# Altium PCB Main-Board-V1.0.0.PcbDoc (part 3 of 3)
Units mil, origin at the board's own origin, x right, y up, seen from the top; angles counter-clockwise.
Board outline 3599.72 x 1771.65 mil, 4 copper layers (Top Layer, Layer 1, Layer 2, Bottom Layer), stack 62.449 mil thick; 106 components, 61 nets, 344 pads, 252 vias.
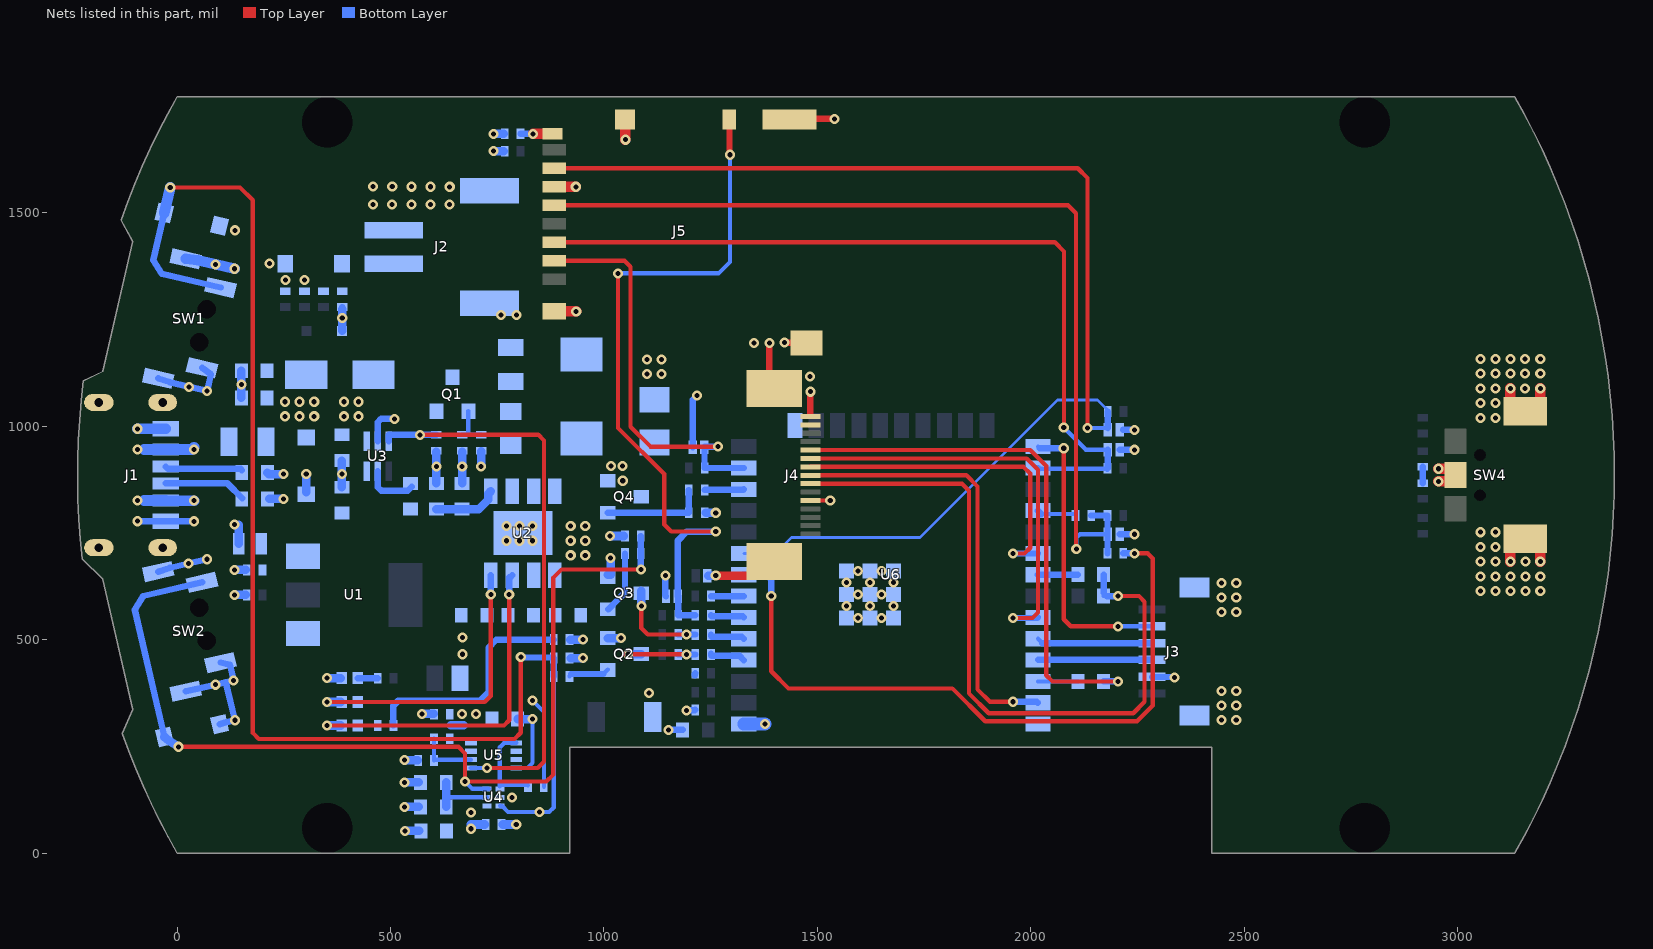
[diagram p4: the nets of this part, all layers, seen from the top]

## Via types
v1: diameter 23.62, hole 11.81, Top Layer to Bottom Layer, 252 vias

## Nets (pads, with @x,y where several pads share a name; then routed paths per layer and width w, separated by ;. In a path a pad name is that pad's centre, name@x,y a point inside that pad or via, vN(x,y) a via of type N, cw(c..) or ccw(c..) an arc to the next point about the centre after c; other vN are vias at no path point) (continued)
GND: C1.1 C2.1 C3.2 C4.1 C5.2 C7.1 C8.1 C9.1 C10.1 C11.2 C12.2 C13.1 C14.1 C15.1 C16.1 C17.1 C18.1 C19.2 C20.1 C21.1 C22.1 C23.1 C24.2 C25.1 D1.1 D2.1 D3.1 D4.1 D6.1 D7.1 D8.1 D9.1 D10.1 D11.1 D12.1 J1.A12 J1.B12 J1.MH1 J1.MH2 J1.MH3 J1.MH4 J2.1 J2.MP1 J2.MP2 J3.2 J3.MP1 J3.MP2 J4.1 J4.11 J4.MP1 J4.MP2 J5.6 J5.S1 J5.S2 J5.S3 J5.S4 LED3.2 pad.SH Q2.2 Q3.2 Q4.2 R1.2 R3.2 R7.1 R10.1 R15.2 R19.1 R34.1 R37.1 R38.1 R41.2 SW1.2 SW1.MP SW2.2 SW2.MP SW3.2 SW4.4 SW4.5 SW4.C U1.1 U2.7 U2.9 U3.2 U4.2 U5.4 U6.1 U6.15 U6.38 U6.39 U6.40 U6.41 U6.42 U6.43 U6.44 U6.45 U6.46 U6.47 | length 3452.2
  Top Layer w10: J4.11@1483.53,826.2 v1(1530,826.2)
  Top Layer w15: J5.S2@1049.05,1718.48 J5.S2@1050,1717.53 ; v1(1387.58,1195.35) 1387.58,1099 J4.MP1@1398.53,1088.05 ; v1@1423.44,1195.35 J5.S4@1473.75,1195.35 ; J5.S3@1434.87,1718.48 1436.4,1720 v1(1540,1720) ; J4.1@1483.53,1026.65 v1@1483.53,1075
  Top Layer w20: v1(1261.82,650.36) 1365.29,650.36 J4.MP2@1398.53,683.6
  Top Layer w25: J5.6@883.7,1561 v1(934,1561) ; J5.S1@884.19,1269.16 v1@934.5,1269.16 ; v1(1050,1671.23) J5.S2@1050,1717.53 ; v1(2954.57,871.12) SW4.C@2994.69,871.12 ; v1(2954.57,900.52) SW4.C@2994.69,900.52 ; v1(3123,682.88) SW4.5@3123,723 ; SW4.4@3123,1048.64 v1(3123,1088.77) ; v1(3193.15,682.88) SW4.5@3193.15,723 ; SW4.4@3193.14,1048.64 v1(3193.15,1088.77)
  Bottom Layer w10: C11.2@385.97,919.65 C11.2@386.39,920.06 ; U5.4@794.58,199.43 820.56,199.43 832.77,211.64 v1(832.77,314.37) ; C16.1@797.43,314.31 C16.1@797.94,314.81 ; J3.2@2283.72,413.39 J3.2@2284.41,412.69 ; v1@2335.31,412.69 v1(2336,412)
  Bottom Layer w15: v1@-92.51,777.59 v1@39.64,777.59 ; SW2.MP@-44.04,659.39 -17.42,668.26 27.14,678.55 v1(70.51,688.56) ; SW1.MP@-44.04,1112.26 -17.42,1103.39 28.31,1092.84 v1(70.51,1083.09) 79.44,1121.76 SW1.2@58.65,1137.04 ; SW2.MP@20.61,379.35 47.96,385.06 90.16,394.81 114.07,400.33 ; D3.1@99.86,302.06 110.15,305.52 v1(136.07,311.5) 114.14,400.03 114.07,400.33 ; SW2.2@102.05,446.64 124.13,441.26 v1(132.59,404.6) 114.07,400.33 ; D12.1@386,1223 D12.1@386.48,1223.47 ; C13.1@386.7,1274.65 386.7,1279.24 C13.1@386.95,1279.5 ; U3.2@470,965.04 470,1009.65 477.87,1017.52 v1(509.34,1017.52) ; v1(1143.98,650.36) 1143.98,603.75 D10.1@1145.37,602.36 ; v1(1151.05,288.58) 1151.3,288.83 1184.07,288.83 C21.1@1184.32,289.08 ; v1(1193.74,334) 1194.57,334.83 1212.99,334.83 C20.1@1213.82,335.66 ; D6.1@1207.8,951.12 1207.8,1061.98 v1(1217.82,1072) ; C19.2@1212.32,416.36 1212.32,419.86 C19.2@1213.82,421.36 ; D8.1@2207.78,747.11 v1(2243,747.11) ; D7.1@2207.78,945.36 2207.96,945.18 2242.68,945.18 v1(2242.86,945) ; D9.1@2215.78,991.61 v1(2243,991.61) ; J3.2@2284.41,412.69 v1@2335.31,412.69 ; C22.1@2918,866.93 C23.1@2918,904.87
  Bottom Layer w20: v1(134.82,605) C4.1@160.44,605 ; v1(134.82,663.49) C7.1@160.77,663.49 ; C5.2@144.76,724.94 v1@144.76,769.48 ; C8.1@150.76,1066.54 v1(150.76,1098.29) C9.1@150.76,1130.04 ; R3.2@211.76,891.65 215.32,888.09 v1(249.23,888.09) ; R1.2@215.92,830.15 v1(249.23,830.15) ; D1.1@302.65,845.38 v1(302.65,888.09) ; v1(351.65,410) LED3.2@383.71,410 ; C12.2@385.97,857.06 v1(385.97,888.09) C11.2@385.97,919.65 ; D12.1@386.48,1223.47 386.48,1274.43 C13.1@386.7,1274.65 ; v1(533,108.72) R15.2@566.31,108.72 ; v1(533,218) 533.39,217.61 C14.1@563.97,217.61 ; v1(534,52.31) C17.1@567.31,52.31 ; v1@574.22,326.24 C15.1@601.04,326.24 ; R7.1@607.5,866.06 v1(607.5,906.16) R37.1@607.5,940.72 ; v1(712.37,906.16) R19.1@712.37,941.09 ; v1(741,1644.61) C24.2@765.06,1644.61 ; v1(741,1685.01) R38.1@765.06,1685.01 ; C18.1@762.52,67.31 v1(794.58,67.31) ; C16.1@797.94,314.81 798.41,314.34 v1(832.77,314.37) ; C2.1@921.24,500.45 v1(951.35,500.45) ; Q2.2@1008.73,503.9 v1(1039.84,503.9) ; Q3.2@1008.73,652.26 1015.58,652.26 1015.73,652.41 v1(1015.73,691.57) ; R34.1@1239.02,797.41 v1(1261.82,797.41) ; D11.1@1244.42,650.36 v1(1261.82,650.36)
  Bottom Layer w25: v1@-92.53,994.09 J1.A12@-26.45,994.09 ; SW1.MP@20.61,1392.3 48.5,1388.93 90.27,1379.28 v1(134.59,1369.05)
  Bottom Layer w30: U6.1@1327.56,302.36 v1(1377,302.36)
  other v1: 784.94,130.57 2446.94,312 2481,312 573.97,325.98 2446.94,346.06 2481,346.06 1105.33,375.7 2446.94,380.12 2481,380.12 90.19,394.69 668.4,466 668.4,505 1595.28,551.18 1650.39,551.18 2446.94,564.76 2481,564.76 1567.72,578.74 1622.83,578.74 1677.95,578.74 2446.94,598.82 2481,598.82 1595.28,606.3 1650.39,606.3 3052.85,613.88 3088.24,613.88 3123,613.88 3158.39,613.88 3193.15,613.88 2446.94,632.88 2481,632.88 1567.72,633.86 1622.83,633.86 1677.95,633.86 3052.85,647.94 3088.24,647.94 3123,647.94 3158.39,647.94 3193.15,647.94 1595.28,661.42 1650.39,661.42 27.11,678.65 3052.85,682.88 3088.24,682.88 3158.39,682.88 3052.85,716.94 3088.24,716.94 771.88,731.94 801.94,731.94 832.77,731.94 3052.85,751.87 3088.24,751.87 771.88,766 801.94,766 832.77,766 134.82,769.48 -92.54,777.63 39.64,777.49 1043.97,872.44 1016.8,906.7 1043.61,906.57 -92.54,994.16 3052.85,1019.77 3088.24,1019.77 3052.85,1054.71 3088.24,1054.71 1483.53,1081 3052.85,1088.77 3088.24,1088.77 3157.76,1088.77 28.11,1092 1483.04,1116.35 3052.85,1123.7 3088.24,1123.7 3123,1123.7 3157.76,1123.7 3193.15,1123.7 3052.85,1157.76 3088.24,1157.76 3123,1157.76 3157.76,1157.76 3193.15,1157.76 1351.73,1195.35 1422.94,1195.85 386.95,1253.58 759.15,1260.85 795,1260.85 935,1268.66 253.66,1342.27 298.54,1342.2 90.19,1378.96 217,1381 135.6,1459.11 638.64,1519.13 459.12,1519.44 504,1519.36 548.88,1519.29 593.76,1519.21 593.83,1561.09 638.71,1561.01 459.2,1561.32 504.08,1561.24 548.95,1561.16
IO0: J3.5 U6.25 | length 676.2
  Top Layer w10: v1(2077,948.61) 2077,548 2093.5,531.5 v1(2204,531.5)
  Bottom Layer w10: U6.25@2016.54,952.36 U6.25@2020.28,948.61 ; v1(2204,531.5) J3.5@2283.72,531.5
  Bottom Layer w15: U6.25@2020.28,948.61 v1(2077,948.61)
LED_K: J4.2 R20.1
  other v1: 1100.94,1122 1135,1122 1100.94,1156.06 1135,1156.06
NetC14_2: C14.2 R14.2 U5.6 | length 138.4
  Bottom Layer w10: R14.2@601.97,268.49 C14.2@601.97,217.21 603.88,219.12 U5.6@688.28,219.12
NetF1_1: F1.1 J1.A9 J1.B9 | length 235.4
  Bottom Layer w15: J1.B9@-26.45,825.98 J1.B9@-26.38,825.91
  Bottom Layer w25: -76.89,825.98 J1.B9@-26.45,825.98 ; -76.89,945.67 34.45,945.67 v1@39.71,950.93 ; J1.B9@-26.38,825.91 39.64,825.91 v1(39.71,825.84)
  other v1: -92.48,825.98 -92.54,945.74 39.71,945.74
NetJ1_A5: J1.A5 R1.1 | length 193.8
  Bottom Layer w15: J1.A5@-26.45,866.14 118.27,866.14 R1.1@153.01,831.4
NetJ1_B5: J1.B5 R3.1 | length 181.5
  Bottom Layer w15: J1.B5@-26.45,905.51 -21.18,900.23 149.03,900.23 R3.1@151.76,897.5
NetJ5_SW-B: J5.SW-B R38.2 | length 75.2
  Top Layer w25: v1(834,1685.01) J5.SW-B@879.76,1685.01
  Bottom Layer w15: R38.2@804.56,1685.01 v1(834,1685.01)
NetL1_1: L1.1 U2.8
NetLED1_1: LED1.1 LED2.1 R4.1
NetLED1_2: LED1.2 U2.3 | length 807.1
  Top Layer w10: v1(351.6,299.17) 765.77,299.17 778.06,311.46 778.06,604.18 v1@779.9,606.02
  Bottom Layer w15: v1@777.71,607.67 U2.3@777.71,645.99 ; v1(778.06,606.02) v1@779.71,607.67 ; U2.3@779.71,645.99 U2.3@785,651.28
  Bottom Layer w20: v1(351.6,299.17) LED1.2@383.66,299.17
NetLED2_2: LED2.2 U2.4 | length 704.3
  Top Layer w10: v1(351.6,354.17) 720.85,354.17 734.9,368.22 v1(734.9,606.02)
  Bottom Layer w15: v1(734.9,606.02) 735,606.02 U2.4@735,651.28
  Bottom Layer w20: v1(351.6,354.17) LED2.2@383.66,354.17
NetLED3_1: LED3.1 R39.2 | length 46.3
  Bottom Layer w15: LED3.1@423.7,410 R39.2@470,410
NetQ1_1: Q1.1 R18.2 R19.2 | length 100
  Bottom Layer w10: R18.2@668,980.04 682.37,980.04 ; Q1.1@682.37,1035.6 682.37,980.04 ; R19.2@712.37,980.04 682.37,980.04
NetQ2_1: Q2.1 R23.2 | length 97.1
  Bottom Layer w10: R23.2@919.29,413.96 919.29,415.7 R23.2@923.29,419.7 ; Q2.1@998.33,419.7 Q2.1@1008.73,430.1
  Bottom Layer w15: R23.2@923.29,419.7 Q2.1@998.33,419.7
NetQ3_1: Q3.1 R24.2 | length 147.3
  Bottom Layer w15: Q3.1@1009.91,571.46 1010.69,571.46 1019.34,580.1 1019.34,580.88 1049.18,610.73 R24.2@1049.18,702.06
NetQ4_1: Q4.1 R33.2 R34.2 | length 243.5
  Bottom Layer w15: Q4.1@1008.73,797.41 R34.2@1198.82,797.41 R33.2@1198.82,850.81
NetQ4_3: Q4.3 R20.2
NetR2_2: R2.2 U6.8 | length 1659.5
  Top Layer w10: v1(1391.8,602.36) 1391.8,426.2 1432,386 1816.09,386 1893.09,309 2248.65,309 2285.59,345.94 2285.59,690.42 2273.65,702.36 v1(2243,702.36)
  Bottom Layer w15: U6.8@1327.56,652.36 1379.73,652.36 1391.8,640.3 v1(1391.8,602.36) ; R2.2@2216.5,702.36 v1(2243,702.36)
NetR6_1: R6.1 U2.6
NetR8_1: R8.1 R10.2
NetR8_2: R8.2 U2.2
NetR12_1: R12.1 U3.5 | length 125.2
  Bottom Layer w15: U3.5@470,894.96 470,857.47 478.79,848.68 540.71,848.68 R12.1@550.15,858.12
NetR15_1: R15.1 R16.1 U4.5 | length 152.8
  Bottom Layer w10: 630.47,130.81 U4.5@726.28,130.81
  Bottom Layer w20: R15.1@630.47,108.72 630.47,130.81 R16.1@630.47,165.72
NetR25_2: R25.2 U6.4 | length 85
  Bottom Layer w15: R25.2@1250.82,467.36 1250.82,463.86 1252.55,462.13 1317.79,462.13 U6.4@1327.56,452.36
NetR26_1: R26.1 U6.36 | length 93.7
  Bottom Layer w10: U6.36@2016.54,402.36 R26.1@2110.2,402.36
NetR27_2: R27.2 U6.5 | length 82.9
  Bottom Layer w15: R27.2@1250.83,512.36 1250.83,508.86 1252.33,507.36 1322.56,507.36 U6.5@1327.56,502.36
NetR28_2: R28.2 U6.6 | length 79.4
  Bottom Layer w15: R28.2@1250.83,557.36 1250.83,556.36 1252.33,554.86 1325.06,554.86 U6.6@1327.56,552.36
NetR29_2: R29.2 U6.7 | length 76.7
  Bottom Layer w15: R29.2@1250.82,602.36 U6.7@1327.56,602.36
NetR30_1: R30.1 U6.31 | length 93.7
  Bottom Layer w15: U6.31@2016.54,652.36 R30.1@2110.2,652.36
NetR46_1: R46.1 U6.28 | length 92.1
  Bottom Layer w10: U6.28@2024.51,794.39 R46.1@2105.31,794.39
  Bottom Layer w15: U6.28@2016.54,802.36 U6.28@2024.51,794.39
NetU5_2: U5.2 U5.3
NTC: R5.1 R7.2 U2.5 | length 153
  Bottom Layer w20: R7.2@607.5,806.06 707.09,806.06 729.21,828.18 729.21,842.15 U2.5@735,847.93
PB1_ILV: Q2.3 R21.1 R25.1 | length 209.8
  Top Layer w10: v1(1056.35,466.06) v1@1193.77,466.06
  Top Layer w20: v1(1193.77,465.36) v1@1193.77,466.06
  Bottom Layer w15: Q2.3@1087.47,466.06 Q2.3@1087.47,466.5 ; R21.1@1173.71,465.36 v1(1193.77,465.36) R25.1@1213.82,465.36
  Bottom Layer w20: v1(1056.35,466.06) Q2.3@1087.47,466.06
PB2_ILV: Q3.3 R22.1 R27.1 | length 247.1
  Top Layer w10: v1@1087.47,586.37 v1(1087.47,579.37) 1087.47,527.5 1102.61,512.36 v1(1193.74,512.36)
  Bottom Layer w15: R22.1@1173.65,512.36 v1(1193.74,512.36) R27.1@1213.83,512.36
  Bottom Layer w20: v1(1087.47,579.37) Q3.3@1087.47,608.86 Q3.3@1087.47,614.86
PB_1: D2.2 R9.1 R23.1 SW1.1 U4.3 | length 3185.5
  Top Layer w10: v1(-15.87,1559.51) 147.49,1559.51 177.57,1529.43 177.57,281.43 191.55,267.45 790.48,267.45 805.19,282.16 v1(805.19,459.85)
  Bottom Layer w10: U4.3@756.58,111.12 757.49,110.21 761.82,110.21 775.44,96.6 v1(848.97,96.6) 852.66,96.6 871.6,96.6 882.29,107.29 R23.1@882.29,413.96
  Bottom Layer w15: D2.2@-29.86,1499.55 -55.64,1389.05 -35.83,1357.18 SW1.1@102.05,1325.01 ; v1@809.19,459.85 810.55,458.49 880.93,458.49 R9.1@882.29,457.13 R23.1@882.29,413.96
  Bottom Layer w25: D2.2@-29.86,1499.55 v1(-15.87,1559.51)
PB_2: D3.2 R11.1 R24.1 SW2.1 U4.6 | length 2299.6
  Top Layer w10: v1@3.89,244.88 8.3,249.3 659.01,249.3 674.5,233.81 v1(674.5,167.99) 864.96,167.99 881.51,184.54 881.51,645.45 900.82,664.76 v1(1086.57,664.76)
  Bottom Layer w10: v1(674.5,167.99) 691.69,150.81 U4.6@730.1,150.81
  Bottom Layer w15: D3.2@-29.42,272.21 -99.04,570.57 -79.22,602.44 SW2.1@58.65,634.61 ; R11.1@1086.18,743 R24.1@1086.18,702.06 1086.37,701.87 1086.37,664.95 v1(1086.57,664.76)
  Bottom Layer w20: D3.2@-29.42,272.21 -18.9,263.56 v1@3.87,249.38
  other v1: 3.89,249.3
PWR_EN: R37.2 U3.3 U5.5 | length 1352.7
  Top Layer w10: v1(569.1,980.07) 846.36,980.07 859.58,966.84 859.58,214.22 844.79,199.43 v1(726.28,199.43)
  Bottom Layer w10: U5.5@688.28,199.43 v1(726.28,199.43)
  Bottom Layer w15: U3.3@495.59,965.04 495.59,979.69 495.96,980.07 R37.2@607.5,980.04
RST_OUT: R13.1 U4.1 U5.1 | length 199.9
  Bottom Layer w10: 756.11,156.97 756.11,160.08 ; U5.1@794.58,258.49 766.41,258.49 756.11,248.19 756.11,160.08 ; R13.1@822.01,159.37 756.69,160.07 756.11,160.08
RXD0: J3.4 U6.34 | length 271.4
  Bottom Layer w10: U6.34@2016.54,502.36 U6.34@2026.77,492.13
  Bottom Layer w15: U6.34@2026.77,492.13 J3.4@2283.72,492.13
SD_CLK: D8.2 J5.5 R2.1 R43.1 R46.2 | length 2246.2
  Top Layer w10: J5.5@883.69,1517.69 2086.89,1517.69 2105.55,1499.03 2105.55,713.56 v1(2106.31,712.8)
  Bottom Layer w10: v1@2106.01,713.1 2106.01,738.32 2114.79,747.11 D8.2@2180.22,747.11
  Bottom Layer w15: v1@2106.01,713.1 v1(2106.31,712.8) ; R46.2@2141.7,791.11 R43.1@2179.5,791.11 R2.1@2179.5,702.36
SD_CMD: D7.2 J5.3 R42.1 U6.26 | length 1948.5
  Top Layer w10: J5.3@883.69,1431.08 2056.1,1431.08 2077.55,1409.62 v1@2077.55,997
  Bottom Layer w10: U6.26@2018.57,900.32 R42.1@2178.46,900.32 ; v1(2077,997) 2128.64,945.36 D7.2@2180.22,945.36
  Bottom Layer w15: U6.26@2016.54,902.36 U6.26@2018.57,900.32 ; R42.1@2178.46,900.32 R42.1@2179.5,901.36 2179.86,901.72 2179.86,945 D7.2@2180.22,945.36
SD_CS: D6.2 J5.2 R17.1 U6.13 | length 956.1
  Top Layer w10: J5.2@883.69,1387.77 1048.23,1387.77 1062.16,1373.84 1062.16,999.08 1108.88,952.36 v1(1267,952.36)
  Bottom Layer w15: v1(1267,952.36) 1266.37,951.73 1235.96,951.73 D6.2@1235.33,951.1 1235.58,950.86 1235.58,902.61 R17.1@1235.82,902.36 U6.13@1327.56,902.36
SD_DATA0: D9.2 J5.7 R44.1 U6.9 | length 2946.7
  Top Layer w10: J5.7@883.69,1604.3 2109.85,1604.3 2132.36,1581.79 v1(2132.36,996)
  Bottom Layer w7: U6.9@1327.56,702.36 1401.97,702.36 1439.13,739.52 1740.29,739.52 2062.58,1061.81 2155.76,1061.81 2173.73,1043.84 2174.28,1043.84 2179.78,1038.34 R44.1@2179.78,1034.84 R44.1@2180,1034.62 ; D9.2@2175.83,996 D9.2@2180.22,991.61
  Bottom Layer w10: v1(2132.36,996) D9.2@2175.83,996
  Bottom Layer w15: D9.2@2180,996 R44.1@2180,1034.62
SD_DET: D10.2 J5.SW-A R28.1 R45.1 | length 1681.4
  Top Layer w10: v1(1033,1358.24) 1033,996.22 1141.1,888.12 1141.1,769.97 1157.71,753.37 v1(1261.82,753.37)
  Top Layer w15: J5.SW-A@1293.14,1718.48 1294.07,1717.55 1294.07,1636.93 v1(1295,1636)
  Bottom Layer w10: v1(1033,1358.24) 1268.24,1358.24 1295,1385 v1(1295,1636)
  Bottom Layer w15: R28.1@1213.83,557.36 R45.1@1173.65,557.36 1173.65,602.36 D10.2@1172.93,602.36 1173.29,602.72 1173.29,732.55 1194.11,753.37 v1(1261.82,753.37)
TFT_BKLT: R33.1 U6.12 | length 92.4
  Bottom Layer w15: R33.1@1235.82,850.81 1236.6,851.58 1326.78,851.58 U6.12@1327.56,852.36
TFT_CLK: J4.7 U6.30 | length 795.7
  Top Layer w10: J4.7@1483.53,904.94 1982.56,904.94 1998.34,889.17 1998.34,715.34 1985,702 v1@1962,702
  Bottom Layer w15: v1(1958,702) 2016.17,702 U6.30@2016.54,702.36
TFT_CS: J4.6 U6.33 | length 1001.5
  Top Layer w10: J4.6@1483.53,924.63 1990.28,924.63 2016.63,898.29 2016.63,563.78 2003.85,551 v1(1958,551)
  Bottom Layer w15: v1(1958,551) 2015.17,551 U6.33@2016.54,552.36
TFT_MOSI: J4.8 U6.37 | length 1032.1
  Top Layer w10: J4.8@1483.53,885.26 1848.84,885.26 1875,859.1 1875,383.85 1904.01,354.84 v1(1958,354.84)
  Bottom Layer w15: v1(1958,354.84) 2014.06,354.84 U6.37@2016.54,352.36
TFT_RS_CMD: J4.5 R26.2 | length 1265.8
  Top Layer w10: J4.5@1483.53,944.31 1998.45,944.31 2035.92,906.84 2035.92,416.83 2050.39,402.36 v1(2204,402.36)
  Bottom Layer w15: R26.2@2170.2,402.36 v1(2204,402.36)
TFT_RST: J4.9 R30.2 R31.1 | length 1683.9
  Top Layer w10: J4.9@1483.53,865.57 1838.43,865.57 1855,849 1855,374.46 1901.44,328.03 2239.61,328.03 2266.37,354.79 2266.37,589.11 2253.12,602.36 v1(2204,602.36)
  Bottom Layer w10: R31.1@2170.2,602.36 2170.2,610.54 R31.1@2178.38,602.36
  Bottom Layer w15: R31.1@2170.2,610.54 R30.2@2170.2,652.36 ; R31.1@2178.38,602.36 v1(2204,602.36)
TXD0: J3.3 U6.35 | length 267.3
  Bottom Layer w10: U6.35@2016.54,452.36 U6.35@2016.93,452.76
  Bottom Layer w15: U6.35@2016.93,452.76 J3.3@2283.72,452.76
VBATT: C10.2 C13.2 D4.2 J2.2 L1.2 Q1.3 R6.2 R40.2
VCC: C11.1 C15.2 C16.2 C17.2 C18.2 D5.1 Q1.2 R9.2 R11.2 R13.2 R14.1 R16.2 U3.1 U4.4 U5.7 U5.8 | length 370.4
  Bottom Layer w10: v1(832.74,357.83) 859.58,330.98 R13.2@859.58,155.49
  Bottom Layer w20: v1(533,165.72) R16.2@566.31,165.72 ; 641.57,299.31 671.62,299.31 ; v1@688.28,67.31 C18.2@720.34,67.31 ; R9.2@922.44,457.13 v1(951.35,457.13) ; v1(1013.73,743) R11.2@1046.37,743
  other v1: 688.28,57.31 688.28,95.26 667.62,325.98 700.43,325.98 390.94,1023.43 425,1023.43 390.94,1057.49 425,1057.49
VCC_SYS: C5.1 C7.2 C12.1 R12.2 U1.3 U3.6
VUSB: C1.2 C2.2 C8.2 C9.2 D1.2 D5.2 F1.2 R4.2 R5.2 R18.1 U2.1 | length 624.5
  Bottom Layer w10: R18.1@668,940.2 R18.1@668,943.04
  Bottom Layer w15: R4.2@506.85,299.31 506.85,346.11 518.57,357.83 710.67,357.83 729.5,376.66 729.5,481.39 747.8,499.69 881.53,499.69 C2.2@882.29,500.45
  Bottom Layer w20: R5.2@668,866.06 v1(668,906.16) R18.1@668,940.2
  other v1: 922.15,697.88 956.21,697.88 922.15,731.94 956.21,731.94 922.15,766 956.21,766 253.21,1023.43 287.27,1023.43 321.34,1023.43 253.21,1057.49 287.27,1057.49 321.34,1057.49
pads on no net: J4.10 J4.12 J4.13 J4.14 J4.15 J5.1 J5.8 SW1.MH SW2.MH SW4. U3.4 U6.14 U6.16 U6.17 U6.18 U6.19 U6.20 U6.21 U6.22 U6.23 U6.24 U6.27 U6.29 U6.32

## Polygon pours and split planes (outlines as drawn)
GND on Bottom Layer "GND_L04_P017" (solid, remove dead copper, pour order 17): 0,0 cw(c1566.86,885.83) 0,1771.65 3133.72,1771.65 cw(c1566.86,885.83) 3133.72,0 2423.66,0 2423.66,248.66 920.25,248.66 920.25,0
NetL1_1 on Bottom Layer "NETL1_1_L04_P008" (solid, pour order 8): 829.51,887.75 861.27,887.75 861.27,818.31 980,818.31 980,931.2 1050,931.2 1050,1010.78 829.51,1010.78
VUSB on Bottom Layer "VUSB_L04_P010" (solid, pour order 10): 869.21,680.91 897.57,680.91 897.57,797.41 980,797.41 980,584.86 920.79,584.86 920.58,584.65 920.58,522.95 900.29,522.95 900.29,487.76 869.4,487.76 869.21,487.95
NetQ4_3 on Bottom Layer "NETQ4_3_L04_P009" (solid, pour order 9): 1069.36,992 1069.36,818.67 1172.82,818.67 1172.82,992
VCC_SYS on Bottom Layer "VCC_SYS_L04_P006" (solid, pour order 6): 353.36,644.72 245.36,644.72 183.74,644.72 183.74,796.9 246.83,796.9 333.51,796.9 333.51,830.27 419.19,830.27 419.19,917.6 452.28,917.6 452.28,829.01 563.87,829.01 563.87,745.01 353.36,745.01
VBATT on Bottom Layer "VBATT_L04_P007" (solid, pour order 7): 711,1002.74 808.15,1002.74 808.15,1031.82 1050,1031.82 1050,1400.32 410.91,1400.32 410.91,1175.89 615.52,1175.89 615.52,1088 711,1088
VCC on Bottom Layer "VCC_L04_P005" (solid, pour order 5): 645,1068.28 595,1068.28 595,1154.46 368.89,1154.46 368.89,942.4 452.28,942.4 452.28,1024.97 462.91,1035.6 491.26,1035.6 509.34,1017.52 645,1017.52
VCC_SYS on Bottom Layer "VCC_SYS_L04_P004" (solid, remove dead copper, pour order 4): 183.74,796.9 262.58,796.9 563.87,796.9 563.87,756 334.29,756 334.29,666.02 183.74,666.02
VCC on Bottom Layer "VCC_L04_P003" (solid, remove dead copper, pour order 3): 616.47,69.81 655.74,69.81 655.74,117.03 736.51,117.03 736.51,20.39 616.47,20.39
NetF1_1 on Bottom Layer "NETF1_1_L04_P000" (solid, pour order 0): 18.73,959.45 18.73,997.56 141.64,997.56 141.64,931.89 -69.95,931.89 -82.55,919.29 -82.55,852.36 -69.95,839.76 5.04,839.76 5.04,812.2 -140.82,812.2 -154.46,825.84 -154.46,945.81 -140.82,959.45
GND on Top Layer "GND_L01_P012" (solid, remove dead copper, pour order 12): 0,0 cw(c1566.86,885.83) 0,1771.65 3133.72,1771.65 cw(c1566.86,885.83) 3133.72,0 2423.66,0 2423.66,248.66 920.25,248.66 920.25,0
VUSB on Top Layer "VUSB_L01_P015" (solid, pour order 15): 976.4,680.91 984.47,688.97 984.47,1172.81 960.28,1197 238.11,1197 224.6,1183.49 224.6,1004.4 239,990 335.06,990 347.02,1001.97 347.02,1071.27 356.75,1081 867,1081 877.2,1070.8 877.2,690.91 887.21,680.91
3V3 on Top Layer "3V3_L01_P002" (solid, pour order 2): 1507.16,958.09 1449.91,958.09 1449.91,859.67 1375,859.67 1365,869.67 1365,979.32 1372.95,987.27 1507.16,987.27
LED_K on Top Layer "LED_K_L01_P011" (solid, pour order 11): 1082.75,1004.81 1090.1,997.46 1266.18,997.46 1507.16,997.46 1507.16,1009.27 1500.82,1009.27 1480.09,1030 1165,1030 1153.52,1041.48 1153.52,1174.95 1147.39,1181.08 1090.38,1181.08 1082.75,1173.45
VCC on Layer 2 "VCC_L03_P016" (solid, remove dead copper, pour order 16): 1079.9,408.31 1079.9,269.22 899.2,269.22 899.2,20.22 471.69,20.22 453,38.91 453,330 477.17,354.17 678.65,354.17 700.24,375.76 700.24,636.32 960.79,636.32 992.02,667.54 992.02,922.81 970.24,944.58 375.32,944.58 362.61,957.29 362.61,1109.61 374,1121 1017.45,1121 1125.13,1121 1133.96,1112.17 1133.96,462.37
3V3 on Layer 2 "3V3_L03_P018" (solid, remove dead copper, pour order 18): 0,0 cw(c1566.86,885.83) 0,1771.65 3133.72,1771.65 cw(c1566.86,885.83) 3133.72,0 2423.66,0 2423.66,248.66 920.25,248.66 920.25,0
VUSB on Layer 2 "VUSB_L03_P013" (solid, pour order 13): 324,1121 211.19,1121 195.76,1105.57 195.76,689.39 228.15,657 950.97,657 978.77,684.8 978.77,905 959.77,924 358.98,924 342.03,940.96 342.03,1102.97
GND on Layer 1 "GND_L02_P014" (solid, remove dead copper, pour order 14): 0,0 cw(c1566.86,885.83) 0,1771.65 3133.72,1771.65 cw(c1566.86,885.83) 3133.72,0 2423.66,0 2423.66,248.66 920.25,248.66 920.25,0

## Other copper
Top Layer:
  rectangle net LED_K: 1333.57,997.46 1449.72,1030
  rectangle net GND: 1173.91,1044.74 1463.5,1060
  rectangle net GND: 1459.91,1023.05 1503.99,1050.39
  rectangle net 3V3: 1365,960.22 1507.16,987.27
  rectangle net LED_K: 1429.53,997.46 1507.16,1009.27
  pour cut-out: 195.76,59.06 ccw(c351.46,59.06) 351.46,-96.64 ccw(c351.46,59.06) 507.16,59.06 ccw(c351.46,59.06) 351.46,214.75 ccw(c351.46,59.06)
  pour cut-out: 2626.57,59.06 ccw(c2782.27,59.06) 2782.27,-96.64 ccw(c2782.27,59.06) 2937.96,59.06 ccw(c2782.27,59.06) 2782.27,214.75 ccw(c2782.27,59.06)
  pour cut-out: 195.76,1712.6 ccw(c351.46,1712.6) 351.46,1556.9 ccw(c351.46,1712.6) 507.16,1712.6 ccw(c351.46,1712.6) 351.46,1868.3 ccw(c351.46,1712.6)
  pour cut-out: 2626.57,1712.6 ccw(c2782.27,1712.6) 2782.27,1556.9 ccw(c2782.27,1712.6) 2937.96,1712.6 ccw(c2782.27,1712.6) 2782.27,1868.3 ccw(c2782.27,1712.6)
  region net GND: 2679.98,1771.65 ccw(c2782.27,1712.6) 2884.55,1771.65
  region net GND: 249.17,1771.65 ccw(c351.46,1712.6) 453.74,1771.65
  region net GND: 453.74,0 ccw(c351.46,59.06) 249.17,0
  region net GND: 2884.55,0 ccw(c2782.27,59.06) 2679.98,0
  pour cut-out: 1505.89,957.29 1505.89,1028.39 1529.53,1028.39 1529.53,957.29
Bottom Layer:
  rectangle net SD_CMD: 2170.5,882.71 2188.5,913.86
  region net GND: 191,914.1 170.67,934.43 161.24,925.01 181.57,904.68
  rectangle net GND: 365.5,1174.45 399.45,1297.3
  rectangle net GND: 574.06,831.06 595,846.25
  rectangle net GND: 314.37,842.06 403.89,859.53
  rectangle net GND: 368.89,842.06 403.89,925.26
  rectangle net GND: 176.76,812.65 323.51,841.22
  rectangle net GND: 134.82,592.5 172.3,802.65
  rectangle net GND: 750.93,20.22 802.97,81.3
  rectangle net GND: 910.31,478.96 963.65,512.95
  rectangle net GND: 930.79,500.45 980.85,574.86
  rectangle net GND: 990.61,823.55 1058.12,920.85
  rectangle net NetR15_1: 622.44,91.22 645.47,132.23
  rectangle net RST_OUT: 746.35,148.57 766.82,164.87
  rectangle net GND: 438.9,1439.68 801.1,1581.42
  rectangle net VCC: 678.65,283.87 752.43,338
  rectangle net GND: 746.35,124.9 784.94,136.71
  rectangle net LED_K: 1083,1032 1153,1176.33
  rectangle net NetQ2_1: 910.29,401.46 928.29,429
  rectangle net NetQ2_1: 990.61,409.34 1026.84,445.24
  rectangle net NetR8_1: 710.83,539.86 790.08,574.86
  rectangle net NetR8_2: 819.21,539.86 850.79,680.91
  rectangle net VUSB: 869.21,487.95 900.29,680.91
  rectangle net NetQ1_1: 655.5,971.04 724.87,989.04
  rectangle net NetQ1_1: 655.5,971.04 698.54,1068.28
  rectangle net NetR12_1: 528.87,840 563.87,881.06
  region net VCC_SYS: 474.8,825.76 450.66,849.89 436.19,835.42 460.33,811.29
  rectangle net GND: 732.2,1165 812,1317.64
  rectangle net NetR6_1: 769.21,818.31 800.79,974.54
  rectangle net VCC_SYS: 419.19,784.33 452.28,917.6
  rectangle net BATT_ADC: 226.7,1175.89 355.5,1288.5
  rectangle net GND: 819.21,749.61 850.79,877.56
  rectangle net NetL1_1: 869.21,818.31 924.76,1010.78
  rectangle net VCC: 368.89,942.4 452.28,1154.46
  rectangle net VBATT: 330.5,1307.5 576.69,1401.5
  rectangle net VUSB: 188.89,930.63 351.86,1154.46
  rectangle net 3V3: 1268.15,334.65 1357.09,370.08
  rectangle net 3V3: 1241.82,334.65 1357.09,354.31
  rectangle net 3V3: 1241.82,271.58 1285.4,354.31
  rectangle net 3V3: 498,375.4 629.13,735
  rectangle net VCC_SYS: 183.74,644.72 241,729.53
  rectangle net NetU5_2: 784.7,219.12 804.02,238.8
  rectangle net VCC: 655.74,54.81 736.51,117.03
  rectangle net VCC: 629.97,232.89 729.5,338
  rectangle net 3V3: 363.89,475 612.2,735
  rectangle net 3V3: 255.55,575.47 549.87,634.53
  rectangle net NetLED1_1: 411.45,285 478.85,368.35
  rectangle net 3V3: 200.3,592.5 294.92,617.5
  pour cut-out: 1059.36,269.87 910.29,269.87 910.29,478.94 1059.36,478.94
  pour cut-out: 195.76,59.06 ccw(c351.46,59.06) 351.46,-96.64 ccw(c351.46,59.06) 507.16,59.06 ccw(c351.46,59.06) 351.46,214.75 ccw(c351.46,59.06)
  pour cut-out: 2626.57,59.06 ccw(c2782.27,59.06) 2782.27,-96.64 ccw(c2782.27,59.06) 2937.96,59.06 ccw(c2782.27,59.06) 2782.27,214.75 ccw(c2782.27,59.06)
  pour cut-out: 195.76,1712.6 ccw(c351.46,1712.6) 351.46,1556.9 ccw(c351.46,1712.6) 507.16,1712.6 ccw(c351.46,1712.6) 351.46,1868.3 ccw(c351.46,1712.6)
  pour cut-out: 2626.57,1712.6 ccw(c2782.27,1712.6) 2782.27,1556.9 ccw(c2782.27,1712.6) 2937.96,1712.6 ccw(c2782.27,1712.6) 2782.27,1868.3 ccw(c2782.27,1712.6)
  region net GND: 2884.55,0 ccw(c2782.27,59.06) 2679.98,0
  region net GND: 453.74,0 ccw(c351.46,59.06) 249.17,0
  region net GND: 249.17,1771.65 ccw(c351.46,1712.6) 453.74,1771.65
  region net GND: 2679.98,1771.65 ccw(c2782.27,1712.6) 2884.55,1771.65
  pour cut-out: 2092.2,324.65 1936.19,324.65 1936.19,1043.69 2092.2,1043.69
  pour cut-out: 255.55,565.28 172.3,565.28 172.3,644.72 255.55,644.72
  pour cut-out: 2252.22,324.65 2096.52,324.65 2096.52,679.86 2252.22,679.86
  pour cut-out: 403.89,919.97 227.19,919.97 227.19,930.49 403.89,930.49
  pour cut-out: 2025.68,1062 2025.68,921.23 1469.86,921.23 1469.86,1062
  pour cut-out: 1417.17,324.65 1247.21,324.65 1247.21,1062 1417.17,1062
  pour cut-out: 1193.21,992 1068.32,992 1068.32,1216.07 1193.21,1216.07
  pour cut-out: 361.69,1298.24 312.5,1298.24 312.5,1423.16 361.69,1423.16
  pour cut-out: 1070.39,1401.5 312.5,1401.5 312.5,1423.16 1070.39,1423.16
  pour cut-out: 696.58,841.27 636.83,841.27 636.83,971.04 696.58,971.04
  pour cut-out: 498,368.39 400.72,368.39 400.72,464.8 498,464.8
  pour cut-out: 615.47,20.39 585.83,20.39 585.83,183.74 615.47,183.74
  pour cut-out: 752.58,81.43 752.58,127.81 899.86,127.81 899.86,81.43

## Silkscreen, mask and mechanical layers (free items; w line width, h text height)
Top Overlay:
  region: 3030,1081.85 2750,1081.85 2750,1063.88 3030,1063.88
  region: 3030,687.97 2750,687.97 2750,670 3030,670
  rectangle: 1530,1608.13 1660.73,1626.1
  rectangle: 1530,1271.37 1660.94,1289.34
  rectangle: 1505.31,708.86 1660.94,726.83
  rectangle: 1505.09,1045.62 1660.72,1063.59
  text "MICRO SD" at 1660.94,1271.37 h80 r90
  text "DISPLAY" at 1660.94,708.86 h80 r90
  text "ENCODER" at 2860.94,670 h80 r90
Bottom Overlay:
  text "MAIN-BOARD" at 2458.74,1660.67 h50
  text "Rev-v1.0" at 2391.01,1579.16 h50
  text "+" at 435.97,1295.95 h80 r270
  text "BATTERY" at 843.66,1261 h80 r270
  text "PWR" at 330.16,384.79 h60
  text "CHG" at 330.15,328.47 h60
  text "VOLTLINK" at 2503.66,296.07 h80 r270
  text "STBY" at 330.15,272.47 h60
  text "RST" at 894.55,264.04 h60 r270
Dimensions:
  drawing of 299 lines, arcs and shapes, not listed
  text "Layer" at 4691.2,2290 h60
  text "Name" at 5101.11,2290 h60
  text "Material" at 6030.85,2290 h60
  text "Thickness" at 6890.62,2290 h60
  text "Constant" at 7540.46,2290 h60
  text "Board Layer Stack" at 8110.32,2290 h60
  text "Top Overlay" at 5101.11,2170 h60
  text "Top Solder" at 5101.11,2050 h60
  text "Solder Resist" at 6030.85,2050 h60
  text "0.010mm" at 6890.62,2050 h60
  text "3.5" at 7540.46,2050 h60
  text "1" at 4691.2,1930 h60
  text "Top Layer" at 5101.11,1930 h60
  text "0.035mm" at 6890.62,1930 h60
  text "Dielectric 2" at 5101.11,1810 h60
  text "PP-006" at 6030.85,1810 h60
  text "0.210mm" at 6890.62,1810 h60
  text "4.1" at 7540.46,1810 h60
  text "2" at 4691.2,1690 h60
  text "Layer 1" at 5101.11,1690 h60
  text "CF-004" at 6030.85,1690 h60
  text "0.015mm" at 6890.62,1690 h60
  text "Dielectric 1" at 5101.11,1570 h60
  text "FR-4" at 6030.85,1570 h60
  text "1.065mm" at 6890.62,1570 h60
  text "4.8" at 7540.46,1570 h60
  text "3" at 4691.2,1450 h60
  text "Layer 2" at 5101.11,1450 h60
  text "CF-004" at 6030.85,1450 h60
  text "0.015mm" at 6890.62,1450 h60
  text "Dielectric 3" at 5101.11,1330 h60
  text "PP-006" at 6030.85,1330 h60
  text "0.210mm" at 6890.62,1330 h60
  text "4.1" at 7540.46,1330 h60
  text "4" at 4691.2,1210 h60
  text "Bottom Layer" at 5101.11,1210 h60
  text "0.035mm" at 6890.62,1210 h60
  text "Bottom Solder" at 5101.11,1090 h60
  text "Solder Resist" at 6030.85,1090 h60
  text "0.010mm" at 6890.62,1090 h60
  text "3.5" at 7540.46,1090 h60
  text "Bottom Overlay" at 5101.11,970 h60
  text "Total board thickness:" at 4691.2,850 h60
  text "1.607mm" at 6890.62,850 h60
Board outline:
  lines w1: -218.82,1106.36 -218.82,1106.41
  lines w5: -219.31,1106.51 ccw(c1569.7,885.13) -222.34,689.82 -173.7,641.84 -103.3,336.87 -128.45,280.38 ccw(c1557.47,883.14) 0,0 920.25,0 920.25,248.66 2423.66,248.66 2423.66,0 3133.72,0 ccw(c1566.86,885.83) 3133.72,1771.65 0,1771.65 ccw(c1566.72,885.89) -131.18,1482.83 -103.62,1433.37 -174.03,1128.39 -218.82,1106.36 ; -218.82,1106.41 -218.83,1106.45 ; 3236.77,905.51 3233.99,905.51 3233.99,944.87 3102.96,944.87 ; 3236.77,905.51 cw(c3236.77,888.51) 3253.78,888.51 3253.78,883.15 cw(c3236.77,883.15) 3236.77,866.15 3234.14,866.15 3234.14,826.76 3102.95,826.76 ; 3087.25,905.5 ccw(c3087.25,888.5) 3070.25,888.5 3070.25,883.14 ccw(c3087.25,883.14) 3087.25,866.14 3102.95,866.14 3102.95,826.77 ; 3087.25,905.49 ccw(c3087.25,905.5) 3087.26,905.5 ; 3087.26,905.5 3102.95,905.5 ; 3102.95,826.76 ccw(c3102.95,826.77) 3102.95,826.77 ; 3102.95,905.5 ccw(c3102.95,905.5) 3102.96,905.51 ; 3102.96,905.51 3102.96,944.87 ; 3102.96,944.87 ccw(c3102.96,944.88) 3102.96,944.87 ; 3221.06,826.76 ccw(c3221.06,826.77) 3221.06,826.76
Mechanical 13:
  lines w5: 3221.06,944.87 ccw(c3221.07,944.88) 3221.07,944.87
Drill Drawing:
  circle w10: c4690.62,3332.28 r33.33
  lines w10: 4657.29,3065.61 4723.96,3065.61 4690.62,2998.94 4657.29,3065.61 ; 4657.29,3148.94 4657.29,3165.61 4673.96,3182.28 4657.29,3198.94 4657.29,3215.61 4673.96,3215.61 4690.62,3198.94 4707.29,3215.61 4723.96,3215.61 4723.96,3198.94 4707.29,3182.28 4723.96,3165.61 4723.96,3148.94 4707.29,3148.94 4690.62,3165.61 4673.96,3148.94 4657.29,3148.94 ; 4657.29,3448.94 4723.96,3448.94 4723.96,3515.61 4657.29,3515.61 4657.29,3448.94 ; 4657.29,3615.61 4673.96,3615.61 4673.96,3598.94 4707.29,3598.94 4707.29,3615.61 4723.96,3615.61 4723.96,3648.94 4707.29,3648.94 4707.29,3665.61 4673.96,3665.61 4673.96,3648.94 4657.29,3648.94 4657.29,3615.61
  lines w15: 4597.5,2953.94 15158.57,2953.94 ; 4597.5,3703.94 15158.57,3703.94 ; 5148.38,2803.94 5148.38,3853.94 ; 5748.22,2803.94 5748.22,3853.94 ; 6867.89,2803.94 6867.89,3853.94 ; 7373.77,2803.94 7373.77,3853.94 ; 8107.57,2803.94 8107.57,3853.94 ; 9607.12,2803.94 9607.12,3853.94 ; 10196.97,2803.94 10196.97,3853.94 ; 10942.77,2803.94 10942.77,3853.94 ; 11592.59,2803.94 11592.59,3853.94 ; 12446.36,2803.94 12446.36,3853.94 ; 13779.97,2803.94 13779.97,3853.94 ; 4597.5,2803.94 15158.57,2803.94 15158.57,3853.94 4597.5,3853.94 4597.5,2803.94
  text "Symbol" at 4687.5,3748.94 h72
  text "Count" at 5193.38,3748.94 h72
  text "Hole Size" at 5793.22,3748.94 h72
  text "Plated" at 6912.89,3748.94 h72
  text "Hole Type" at 7418.77,3748.94 h72
  text "Drill Layer Pair" at 8152.57,3748.94 h72
  text "Via/Pad" at 9652.12,3748.94 h72
  text "Pad Shape" at 10241.97,3748.94 h72
  text "Template" at 10987.77,3748.94 h72
  text "Description" at 11637.59,3748.94 h72
  text "Hole Tolerance (+)" at 12491.36,3748.94 h72
  text "Hole Tolerance (-)" at 13824.97,3748.94 h72
  text "2" at 5193.38,3598.94 h60
  text "27.56mil (0.700mm)" at 5793.22,3598.94 h60
  text "NPTH" at 6912.89,3598.94 h60
  text "Round" at 7418.77,3598.94 h60
  text "Top Layer - Bottom Layer" at 8152.57,3598.94 h60
  text "Pad" at 9652.12,3598.94 h60
  text "Rounded" at 10241.97,3598.94 h60
  text "c0hn70p0" at 10987.77,3598.94 h60
  text "4" at 5193.38,3448.94 h60
  text "20.47mil (0.520mm)" at 5793.22,3448.94 h60
  text "PTH" at 6912.89,3448.94 h60
  text "Slot" at 7418.77,3448.94 h60
  text "Top Layer - Bottom Layer" at 8152.57,3448.94 h60
  text "Pad" at 9652.12,3448.94 h60
  text "Rounded" at 10241.97,3448.94 h60
  text "(Mixed)" at 10987.77,3448.94 h60
  text "4" at 5193.38,3298.94 h60
  text "43.31mil (1.100mm)" at 5793.22,3298.94 h60
  text "NPTH" at 6912.89,3298.94 h60
  text "Round" at 7418.77,3298.94 h60
  text "Top Layer - Bottom Layer" at 8152.57,3298.94 h60
  text "Pad" at 9652.12,3298.94 h60
  text "Rounded" at 10241.97,3298.94 h60
  text "c0hn110" at 10987.77,3298.94 h60
  text "4" at 5193.38,3148.94 h60
  text "118.11mil (3.000mm)" at 5793.22,3148.94 h60
  text "PTH" at 6912.89,3148.94 h60
  text "Round" at 7418.77,3148.94 h60
  text "Top Layer - Bottom Layer" at 8152.57,3148.94 h60
  text "Pad" at 9652.12,3148.94 h60
  text "Rounded" at 10241.97,3148.94 h60
  text "c152h300" at 10987.77,3148.94 h60
  text "252" at 5193.38,2998.94 h60
  text "11.81mil (0.300mm)" at 5793.22,2998.94 h60
  text "PTH" at 6912.89,2998.94 h60
  text "Round" at 7418.77,2998.94 h60
  text "Top Layer - Bottom Layer" at 8152.57,2998.94 h60
  text "Via" at 9652.12,2998.94 h60
  text "Rounded" at 10241.97,2998.94 h60
  text "v60h30" at 10987.77,2998.94 h60
  text "266 Total" at 5193.38,2848.94 h60
  text "Slot definitions :" at 4687.5,2703.97 h60
  text "Routed Path Length" at 5720.19,2703.97 h60
  text "= Calculated from tool start centre position to tool end centre position." at 6822.86,2703.97 h60
  text "Hole Length" at 5720.19,2603.99 h60
  text "= Routed Path Length + Tool Size = Slot length as defined in the PCB layout" at 6412.99,2603.99 h60

## Dimensions
-232.95,885.13 to 3366.79,885.83 on Dimensions
3133.72,0 to 3133.72,1771.65 on Dimensions
0,1771.65 to 3133.72,1771.65 on Dimensions

## Text inside footprints (layer, text, board x,y; h text height)
C3: Bottom Overlay "+" at 582.98,473.6 h25 r180
C5: Bottom Overlay "+" at 223.46,759.17 h25
J4: Top Overlay "1" at 1415.03,1026.83 h31.5 r270